# Altium PCB PIC18F.PcbDoc
Units mm, origin at the board's own origin, x right, y up, seen from the top; angles counter-clockwise.
Board outline 68 x 46 mm, 2 copper layers (Top Layer, Bottom Layer); 20 components, 29 nets, 98 pads, 0 vias.
Unrouted connection lines stored in the file: 20.
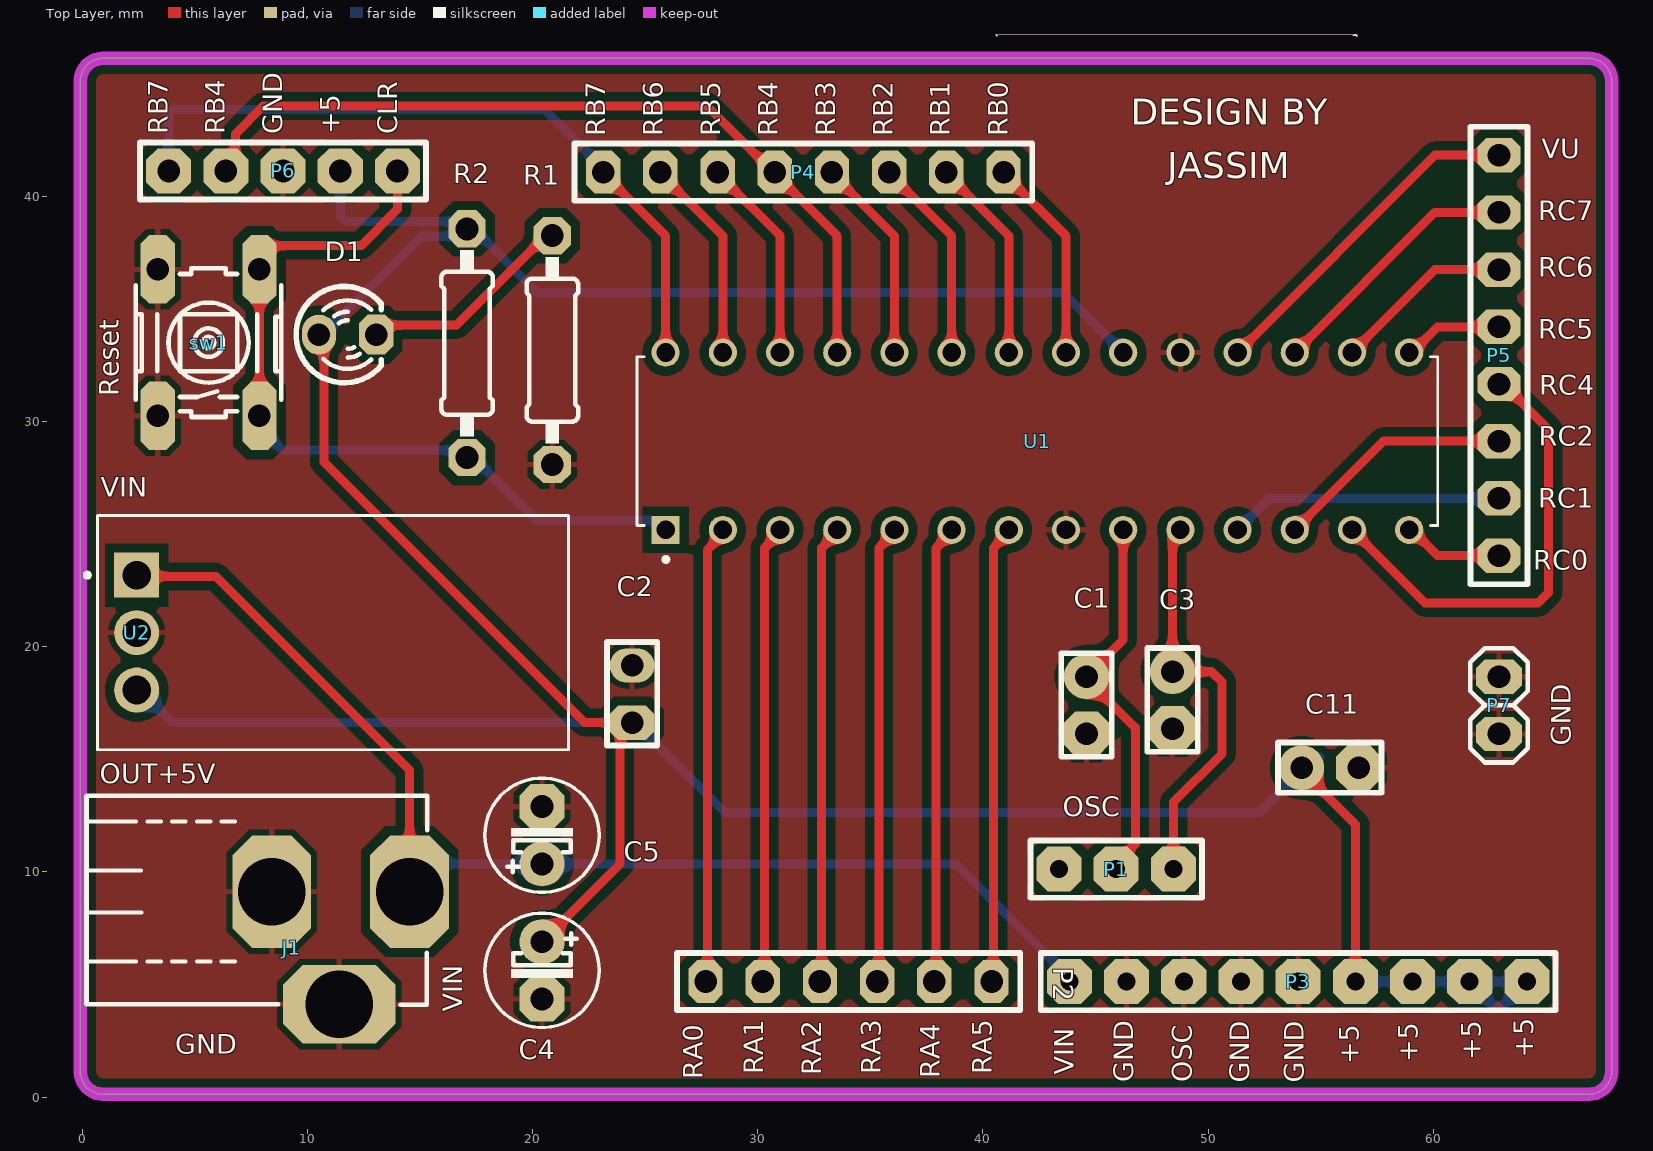
[diagram p0: Top Layer view]
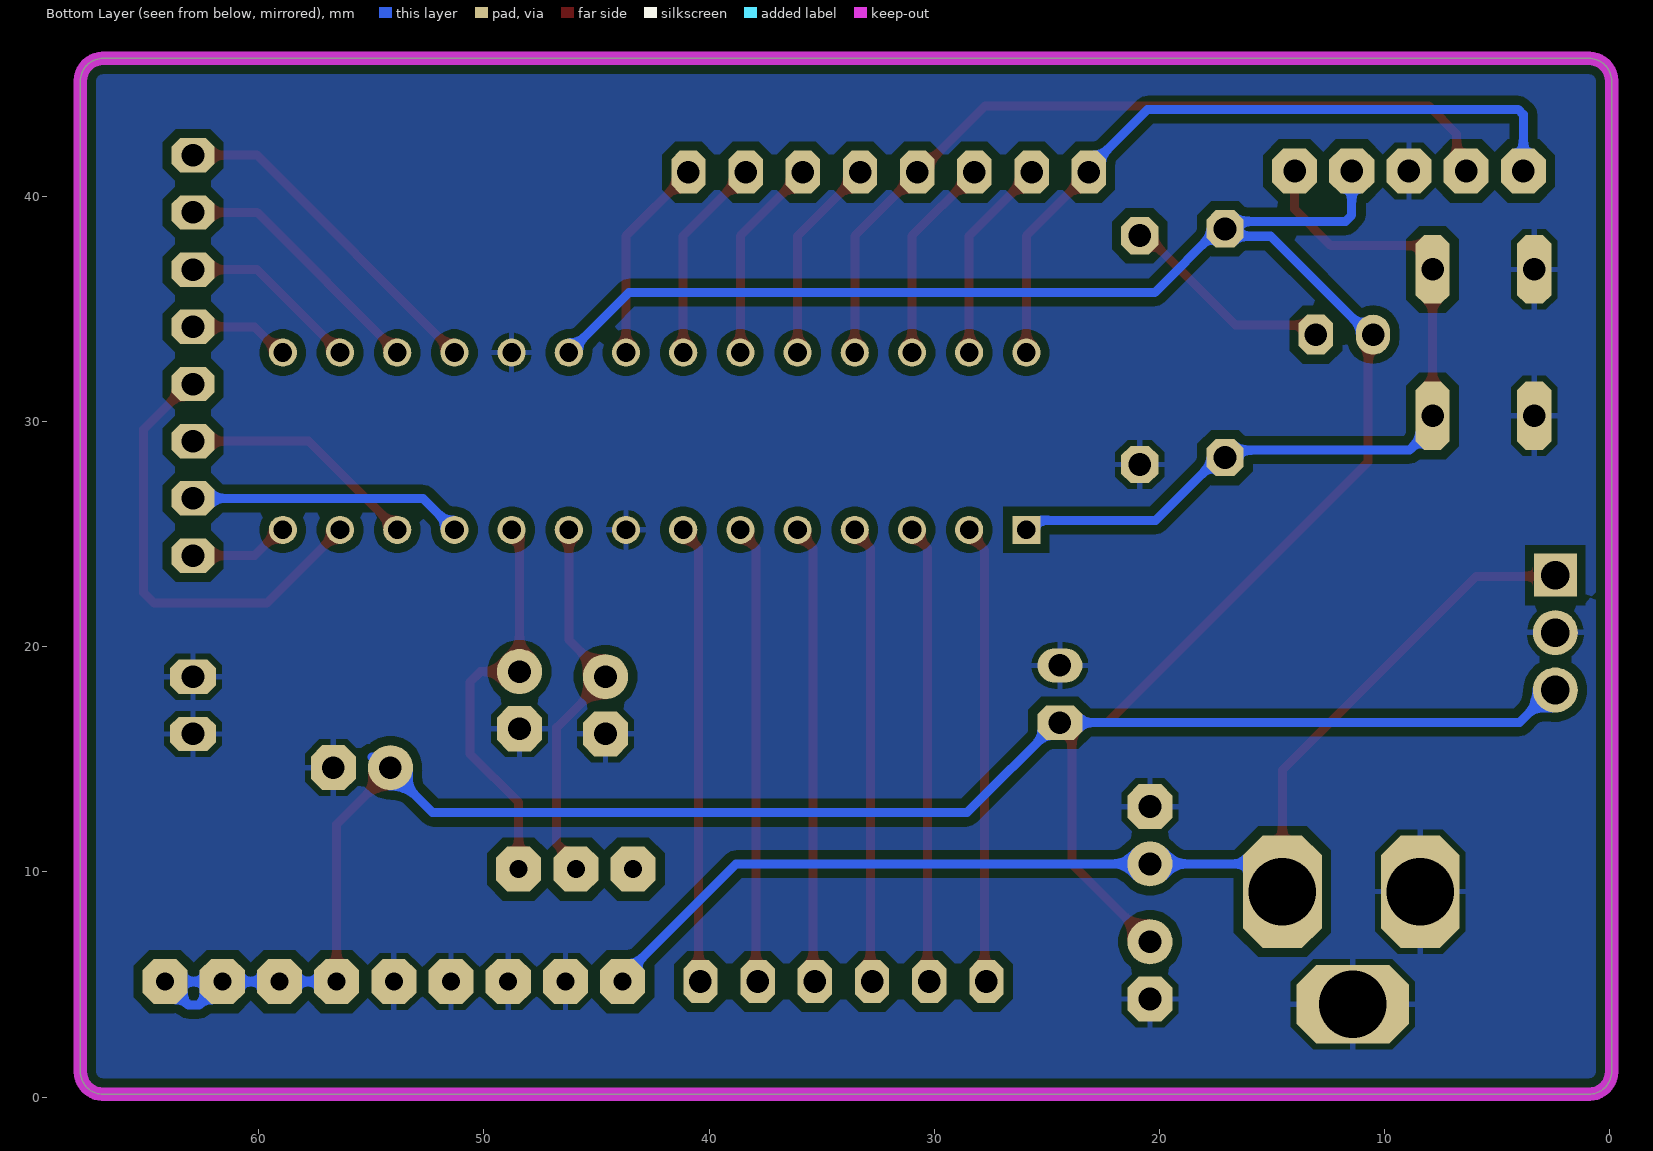
[diagram p1: Bottom Layer view, seen from below]
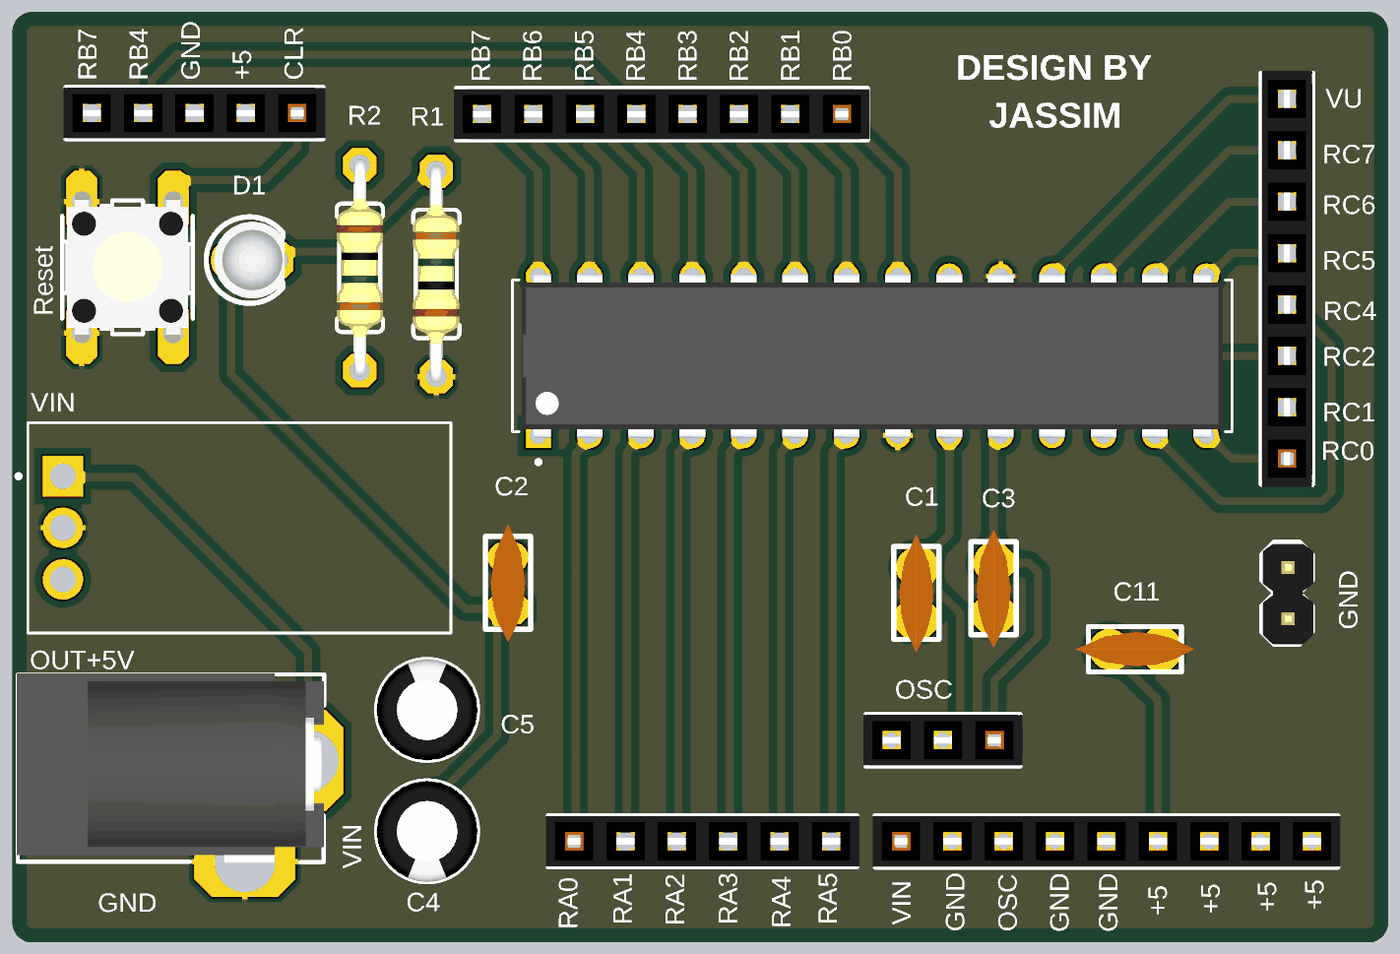
[diagram p2: 3D render of the assembled board from above, using the file's embedded part models]

## Layer stack, top to bottom
Top Solder: solder mask 0.0102, Solder Resist, Dk 3.5
Top Layer: signal copper 0.0356
Dielectric 1: dielectric 0.32, FR-4, Dk 4.8
Bottom Layer: signal copper 0.0356
Bottom Solder: solder mask 0.0102, Solder Resist, Dk 3.5

## Board outline
0.922,0.125 cw(c0.922,1.125) -0.078,1.125 -0.078,45.125 cw(c0.922,45.125) 0.922,46.125 66.922,46.125 cw(c66.922,45.125) 67.922,45.125 67.922,1.125 cw(c66.922,1.125) 66.922,0.125

## Design rules (kind name [scope] priority, off if disabled: settings)
Clearance [All] p1: gap=0.4 ignorepadtopadclearanceinfootprint=FALSE
HoleSize [All] p1: absolutevalues=TRUE maxlimit=10 minlimit=0 maxpercent=80.000 minpercent=20.000
PolygonConnect [All] p1: connectstyle=Relief reliefconductorwidth=0.254 reliefentries=4 polygonreliefangle="90 Angle" airgapwidth=0.254
RoutingVias [All] p1: holewidth=0.711 width=1.27 viastyle="Through Hole" minholewidth=0.711 minwidth=1.27 maxholewidth=0.711 maxwidth=1.27
SilkToSilkClearance [All] p1: silktosilkclearance=0
SilkToSolderMaskClearance [IsPad] p1: minsilkscreentomaskgap=0 clearancetoexposedcopper=TRUE
SolderMaskExpansion [All] p1: expansion=0.102 istentingtop=FALSE
SupplyNets "Schematic Supply Nets_2" [InNet('+5')] p1: voltage=0.000
SupplyNets "Schematic Supply Nets_1" [InNet('VIN')] p2: voltage=0.000
SupplyNets "Schematic Supply Nets" [InNet('GND')] p3: voltage=0.000
Width [All] p1: maxlimit=1 minlimit=0.254 preferedwidth=0.254
27 further rules are at their usual default settings.

## Components (designator, comment, footprint, x,y, rotation, side; value= is the part's Value field where it differs from the comment)
C1 "22pF" My_cap100n#1 44.602,17.399 r90 top
C2 "100nF" My_cap100n#2 24.422,17.895 r90 top
C3 "22pF" My_cap100n#1 48.422,17.625 r90 top
C4 "1uf" MY_E2.5-5mm 20.422,5.625 r270 top
C5 "100uf" MY_E2.5-5mm 20.422,11.625 r90 top
C11 "100nF" My_cap100n#1 55.422,14.625 r180 top
D1 "LED" My_LED3MM 11.786,33.858 r0 top
J1 "DC_Jack" My_DC_Jack 5.171,9.125 r270 top
P1 "Header 3" MY_FE03 45.922,10.125 r180 top
P2 "Header 6" MY_FE06 34.036,5.131 r0 top
P3 "Header 9" MY_FE09 54.002,5.125 r0 top
P4 "Header 8" MY_FE08 32.029,41.072 r180 top
P5 "Header 8" MY_FE08 62.922,32.935 r90 top
P6 "Header 5" MY_FE05 8.922,41.125 r180 top
P7 "Header 2" My_1X02 62.922,18.665 r90 top
R1 "330R" MY_(0.25w)_0207_10 20.879,33.172 r90 top
R2 "10K" MY_(0.25w)_0207_10 17.094,33.477 r270 top
sw1 "Tac switch" MY_TACTILE-PTH 5.613,33.503 r90 top
U1 "PIC18F2550-I/SP" DIP787W45P254L3556H508Q28 42.422,29.125 r90 top
U2 "L7805CV" TO255P1040X460X1968-3 2.422,23.175 r270 top

## Footprints (in the part's own frame and the unit in brackets; to place one, negate y for a bottom-side part, rotate by r counter-clockwise, add the part's x,y. Pads: shape width x height; smd on the part's side, far side on the other; paste and mask are expansions set on the pad)
DIP787W45P254L3556H508Q28 [mm]
  rect 1.25x1.25 / inner round 1.25 / far side rect 1.25x1.25 hole 0.83: 1(-3.937,16.51)
  round 1.25 hole 0.83: 2(-3.937,13.97) 3(-3.937,11.43) 4(-3.937,8.89) 5(-3.937,6.35) 6(-3.937,3.81) 7(-3.937,1.27) 8(-3.937,-1.27) 9(-3.937,-3.81) 10(-3.937,-6.35) 11(-3.937,-8.89) 12(-3.937,-11.43) 13(-3.937,-13.97) 14(-3.937,-16.51) 15(3.937,-16.51) 16(3.937,-13.97) 17(3.937,-11.43) 18(3.937,-8.89) 19(3.937,-6.35) 20(3.937,-3.81) 21(3.937,-1.27) 22(3.937,1.27) 23(3.937,3.81) 24(3.937,6.35) 25(3.937,8.89) 26(3.937,11.43) 27(3.937,13.97) 28(3.937,16.51)
  silkscreen extent -5.35,-17.78 3.75,17.78, body extent -4.06,-17.34 4.06,17.34, height 5.08
My_1X02 [mil]
  oct 60x80 hole 39.37: 1(-100,0) 2(0,0)
  silkscreen extent -150,-50 50,50, body extent -150,-51 46,47, height 323
MY_(0.25w)_0207_10 [mil]
  oct 65x65 hole 40: 1(-200,0) 2(200,0)
  silkscreen extent -163,-45 163,45, body extent -212,-45 212,46, height 96
My_cap100n#1 [mm]
  oct 2x2 hole 1: 1(-1.27,0)
  round 2 hole 1: 2(1.27,0)
  silkscreen extent -2.29,-1.12 2.31,1.12, body extent -2.92,-0.85 2.92,0.85, height 6.22
My_cap100n#2 [mm]
  oct 1.524x2 hole 1: 1(-1.27,0)
  oval 1.524x2 hole 1: 2(1.27,0)
  silkscreen extent -2.29,-1.12 2.31,1.12, body extent -2.92,-0.85 2.92,0.85, height 6.22
My_DC_Jack [mm]
  round 0 on Top Paste: 0(0,-1.118)
  oct 5x3.5 hole 3: 1(0,9.373) 3(0,3.251)
  oct 3.5x5 hole 3: 2(5.004,6.248)
  silkscreen extent -4.25,-4.98 5.03,10.16, body extent -4.32,-5.04 5.08,10.16, height 11.02
MY_E2.5-5mm [mm]
  round 2 hole 1.016: +(-1.27,0)
  oct 2x2 hole 1.016: -(1.27,0)
  silkscreen extent -2.54,-2.54 2.54,2.54, body extent -2.5,-2.5 2.49,2.5, height 10.03
MY_FE03 [mm]
  oct 2x2 hole 0.8: 1(-2.54,0) 2(0,0) 3(2.54,0)
  silkscreen extent -3.81,-1.27 3.81,1.27, body extent -3.93,-1.25 3.94,1.25, height 8.5
MY_FE05 [mm]
  oct 2x2 hole 1: 1(-5.08,0) 2(-2.54,0) 3(0,0) 4(2.54,0) 5(5.08,0)
  silkscreen extent -6.35,-1.27 6.35,1.27, body extent -6.47,-1.25 6.48,1.25, height 8.5
MY_FE06 [mm]
  oct 1.524x1.905 hole 1: 1(-6.35,0) 2(-3.81,0) 3(-1.27,0) 4(1.27,0) 5(3.81,0) 6(6.35,0)
  silkscreen extent -7.62,-1.27 7.62,1.27, body extent -7.74,-1.25 7.75,1.25, height 8.5
MY_FE08 [mm]
  oct 1.524x1.905 hole 1: 1(-8.89,0) 2(-6.35,0) 3(-3.81,0) 4(-1.27,0) 5(1.27,0) 6(3.81,0) 7(6.35,0) 8(8.89,0)
  silkscreen extent -10.16,-1.27 10.16,1.27, body extent -10.28,-1.25 10.29,1.25, height 8.5
MY_FE09 [mm]
  oct 2x2 hole 0.8: 1(-10.16,0) 2(-7.62,0) 3(-5.08,0) 4(-2.54,0) 5(0,0) 6(2.54,0) 7(5.08,0) 8(7.62,0) 9(10.16,0)
  silkscreen extent -11.43,-1.27 11.43,1.27, body extent -11.55,-1.25 11.56,1.25, height 8.5
My_LED3MM [mil]
  oval 60x70 hole 39.37: A(-50,0)
  oct 60x70 hole 39.37: K(50,0)
  silkscreen extent -90,-84 59,84, body extent -75,-75 63,75, height 217
MY_TACTILE-PTH [mil]
  oct 120x60 hole 39.37: 1(-128,89) 1(128,89) 2(-128,-89) 2(128,-89)
  silkscreen extent -130,-127 130,127, body extent -152,-118 152,118, height 197
TO255P1040X460X1968-3 [mm]
  rect 2x2 / inner round 1.91 / far side rect 1.91x1.91 hole 1.27: 1(0,0)
  round 2 hole 1.27: 2(2.55,0) 3(5.1,0)
  silkscreen extent -2.65,-2.29 7.75,19.18, body extent -2.56,-0.2 7.64,19.06, height 4.5

## Part data
C1 C2 C3 C11: library part "Cap ceramic", "None polar capacitor", ASiD Part Number=C-AS, Volte=50v
C4 C5: library part "Cap Pol", "Polar capacitor", ASiD Part Number=C-AS, Volte=25v
D1: "Typical INFRARED GaAs LED", ASiD Part Number=LED-AS
J1: ASiD Part Number=DC_Jack-AS
P1: "Header, 3-Pin", ASiD Part Number="Header 3-AS"
P2: "Header, 6-Pin", ASiD Part Number="Header 6-AS"
P3: "Header, 9-Pin", ASiD Part Number="Header 9-AS"
P4 P5: "Header, 8-Pin, Dual row", ASiD Part Number="Header 8-AS"
P6: "Header, 5-Pin", ASiD Part Number="Header 5-AS"
P7: "Header, 2-Pin", ASiD Part Number="Header 2-AS"
R1 R2: library part Res, "Standard resistor 1K", ASiD Part Number=Res-AS
sw1: "small tac switch", ASiD Part Number="Tac switch-AS"
U1: "PIC PICÂ® 18F Microcontroller IC 8-Bit 48MHz 32KB (16K x 16) FLASH 28-SPDIP", Package="SPDIP-28 Microchip", Check_prices=https://www.snapeda.com/parts/PIC18F2550-I/SP/Microchip/view-part/?ref=eda, Digi-Key_Part_Number=PIC18F2550-I/SP-ND, MF=Microchip, MP=PIC18F2550-I/SP, Purchase-URL=https://pricing.snapeda.com/search/part/PIC18F2550-I/SP/?ref=eda, SnapEDA_Link=https://www.snapeda.com/parts/PIC18F2550-I/SP/Microchip/view-part/?ref=snap
U2: "Linear Voltage Regulator IC Positive Fixed 1 Output 1.5A TO-220", Package="TO-220-3 STMicroelectronics", Check_prices=https://www.snapeda.com/parts/L7805CV/STMicroelectronics/view-part/?ref=eda, MF=STMicroelectronics, MP=L7805CV, SnapEDA_Link=https://www.snapeda.com/parts/L7805CV/STMicroelectronics/view-part/?ref=snap

## Nets (pads, with @x,y where several pads share a name; then routed paths per layer and width w, separated by ;. In a path a pad name is that pad's centre, name@x,y a point inside that pad or via, vN(x,y) a via of type N, cw(c..) or ccw(c..) an arc to the next point about the centre after c; other vN are vias at no path point)
+5: C2.1 C4.+ C11.2 D1.A P3.6 P3.7 P3.8 P3.9 P6.2 R2.1 U1.20 U2.3 | length 158.2
  Top Layer w0.4: D1.A 10.731,33.643 10.731,28.208 22.313,16.625 C2.1 23.886,16.089 23.886,10.359 C4.+ ; C11.2 54.152,14.498 56.542,12.108 P3.6
  Bottom Layer w0.4: U2.3 2.57,18.075 4.02,16.625 C2.1 ; D1.A 10.693,33.858 15.062,38.227 16.764,38.227 R2.1 ; P6.2 11.462,39.16 11.735,38.887 16.764,38.887 R2.1 ; C2.1@24.549,16.625 28.549,12.625 52.279,12.625 54.152,14.498 C11.2 54.221,14.625 54.699,15.103 C11.2@54.975,15.103 ; U1.20 43.568,35.726 20.221,35.726 17.39,38.557 R2.1 ; P3.6 P3.7 P3.8 62.666,4.081 63.118,4.081 P3.9
GND: C1.1 C2.2 C3.1 C4.- C5.- C11.1 J1.2 J1.3 P3.2 P3.3 P3.4 P3.5 P6.3 P7.1 P7.2 R1.1 sw1.1 U1.8 U1.19 U2.2
MCLR: P6.1 R2.2 sw1.2 U1.1 | length 36.2
  Top Layer w0.4: sw1.2@7.874,30.251 7.874,36.754 7.874,37.252 8.436,37.814 12.389,37.814 14.002,39.427 P6.1
  Bottom Layer w0.4: sw1.2@7.874,30.251 7.874,29.753 8.9,28.727 16.764,28.727 R2.2 17.39,28.397 20.174,25.613 25.487,25.613 U1.1
NetD1_K: D1.K R1.2 | length 9.6
  Top Layer w0.4: D1.K 13.481,34.283 16.614,34.283 20.583,38.252 R1.2
OSC1: C1.2 P1.2 U1.9 | length 17.2
  Top Layer w0.4: C1.2 C1.2@44.729,18.669 ; P1.2 45.922,10.391 46.768,11.237 46.768,16.406 44.549,18.625 46.232,20.308 U1.9
OSC2: C3.2 P1.1 U1.10 | length 18
  Top Layer w0.4: P1.1 48.462,13.091 50.622,15.251 50.622,18.427 50.154,18.895 C3.2 48.422,24.716 48.772,25.066 U1.10
RA0: P2.1 U1.2 | length 20.3
  Top Layer w0.4: P2.1@27.762,5.125 27.762,24.295 28.452,24.985 U1.2
RA1: P2.2 U1.3 | length 20.3
  Top Layer w0.4: P2.2@30.302,5.125 30.302,24.376 30.992,25.066 U1.3
RA2: P2.3 U1.4 | length 20.3
  Top Layer w0.4: P2.3@32.842,5.125 32.842,24.376 33.532,25.066 U1.4
RA3: P2.4 U1.5 | length 20.3
  Top Layer w0.4: P2.4@35.382,5.125 35.382,24.376 36.072,25.066 U1.5
RA4: P2.5 U1.6 | length 20.3
  Top Layer w0.4: P2.5@37.922,5.125 37.922,24.376 38.612,25.066 U1.6
RA5: P2.6 U1.7 | length 20.3
  Top Layer w0.4: P2.6@40.462,5.125 40.462,24.376 41.152,25.066 U1.7
RB0: P4.1 U1.21 | length 9.2
  Top Layer w0.4: P4.1@41.002,41.125 41.002,40.935 43.692,38.245 U1.21
RB1: P4.2 U1.22 | length 9.2
  Top Layer w0.4: P4.2@38.462,41.125 38.462,40.935 41.152,38.245 U1.22
RB2: P4.3 U1.23 | length 9.2
  Top Layer w0.4: P4.3@35.922,41.125 35.922,40.935 38.612,38.245 U1.23
RB3: P4.4 U1.24 | length 9.2
  Top Layer w0.4: P4.4@33.382,41.125 33.382,40.935 36.072,38.245 U1.24
RB4: P4.5 P6.4 U1.25 | length 36.5
  Top Layer w0.4: P6.4 6.799,41.542 6.799,42.766 8.052,44.018 27.74,44.018 30.686,41.072 P4.5 ; P4.5@30.842,40.935 33.532,38.245 U1.25
RB5: P4.6 U1.26 | length 9.2
  Top Layer w0.4: P4.6@28.302,41.125 28.302,40.935 30.992,38.245 U1.26
RB6: P4.7 U1.27 | length 9.2
  Top Layer w0.4: P4.7@25.762,41.125 25.762,40.935 28.452,38.245 U1.27
RB7: P4.8 P6.5 U1.28 | length 32.3
  Top Layer w0.4: P4.8@23.222,41.125 23.222,40.935 25.912,38.245 U1.28
  Bottom Layer w0.4: P6.5 3.842,43.631 4.076,43.866 20.525,43.866 P4.8@23.229,41.162
RC0: P5.2 U1.11 | length 12.2
  Bottom Layer w0.4: U1.11 52.709,26.585 P5.2
RC1: P5.3 U1.12 | length 10.7
  Top Layer w0.4: U1.12 57.789,29.125 P5.3
RC2: P5.4 U1.13 | length 20.5
  Top Layer w0.4: U1.13 59.635,21.946 64.657,21.946 65.126,22.414 65.126,29.644 63.104,31.665 P5.4
RC3: P5.5 U1.15 | length 4.5
  Top Layer w0.4: U1.15 59.054,33.062 60.197,34.205 P5.5
RC4: P5.6 U1.16 | length 8.1
  Top Layer w0.4: U1.16 60.075,36.745 P5.6
RC5: P5.7 U1.17 | length 11.6
  Top Layer w0.4: U1.17 60.075,39.285 P5.7
RC6: P5.8 U1.18 | length 15.2
  Top Layer w0.4: U1.18 60.075,41.825 P5.8
VIN: C5.+ J1.1 P3.1 U2.1 | length 53.2
  Top Layer w0.4: U2.1 2.472,23.125 5.922,23.125 14.543,14.504 J1.1
  Bottom Layer w0.4: J1.1 15.771,10.353 20.419,10.353 C5.+ 38.802,10.355 43.842,5.316 P3.1
VU: P5.1 U1.14 | length 4.5
  Top Layer w0.4: U1.14 59.054,25.188 60.197,24.045 P5.1
pads on no net: J1.0 P1.3

## Polygon pours and split planes (outlines as drawn)
GND on Bottom Layer "GND_L02_P000" (solid, remove dead copper, pour order 0): 0.922,22.125 -1.078,24.125 -1.078,50.125 73.922,50.125 75.922,48.125 73.922,46.125 73.922,-5.875 -1.078,-5.875 -1.078,24.125
GND on Top Layer "GND_L01_P001" (solid, remove dead copper, pour order 1): -3.078,50.125 -3.078,-7.875 -6.078,-10.875 73.922,-10.875 73.922,46.125 77.922,50.125

## Keep-outs
Keep-Out Layer:
  the board outline again, w0.6

## Silkscreen, mask and mechanical layers (free items; w line width, h text height)
Top Overlay:
  region: 51.388,47.17 40.635,47.169 40.634,47.153 40.618,47.154 40.617,47.17 40.604,47.171 40.598,47.169 40.599,47.151 40.618,47.152 40.619,47.132 40.635,47.131 40.634,47.106 40.618,47.107 40.617,47.132 40.599,47.134 40.597,47.151 40.578,47.153 40.569,47.158 40.567,47.167 40.572,47.174 40.582,47.178 40.586,47.18 40.592,47.186 40.601,47.188 56.491,47.186 56.497,47.184 56.504,47.186 56.512,47.188 56.529,47.189 56.558,47.187 56.569,47.185 56.57,47.18 56.564,47.17 56.558,47.169 56.605,47.168 56.615,47.172 56.628,47.17 56.631,47.167 56.629,47.158 56.626,47.155 56.611,47.153 56.603,47.151 56.602,47.15 56.604,47.144 56.605,47.114 56.621,47.112 56.622,47.1 56.619,47.097 56.607,47.095 56.604,47.098 56.603,47.114 56.586,47.112 56.584,47.108 56.583,47.148 56.585,47.15 56.57,47.151 56.566,47.147 56.554,47.148 56.556,47.152 56.558,47.158 56.557,47.168 56.508,47.17 56.504,47.174 56.489,47.172 56.48,47.169 56.517,47.167 56.513,47.154 56.509,47.15 56.51,47.147 56.554,47.146 56.553,47.13 56.509,47.131 56.508,47.147 56.478,47.148 56.48,47.156 56.479,47.168 56.424,47.169 56.445,47.167 56.446,47.147 56.478,47.146 56.477,47.13 56.445,47.131 56.444,47.147 56.424,47.148 56.423,47.168 56.378,47.17 51.39,47.17
  text "DESIGN BY" at 46.558,42.772 h2
  text "RB7" at 4.089,42.748 h1.5 r90
  text "RB4" at 6.62,42.748 h1.5 r90
  text "GND" at 9.184,42.748 h1.5 r90
  text "+5" at 11.719,42.748 h1.5 r90
  text "CLR" at 14.284,42.748 h1.5 r90
  text "RB7" at 23.52,42.67 h1.5 r90
  text "RB6" at 26.081,42.67 h1.5 r90
  text "RB5" at 28.637,42.67 h1.5 r90
  text "RB4" at 31.177,42.67 h1.5 r90
  text "RB3" at 33.737,42.67 h1.5 r90
  text "RB2" at 36.281,42.67 h1.5 r90
  text "RB1" at 38.825,42.67 h1.5 r90
  text "RB0" at 41.385,42.67 h1.5 r90
  text "VU" at 64.827,41.392 h1.5
  text "JASSIM" at 48.184,40.41 h2
  text "RC7" at 64.672,38.642 h1.5
  text "RC6" at 64.672,36.142 h1.5
  text "RC5" at 64.668,33.392 h1.5
  text "Reset" at 1.907,31.116 h1.5 r90
  text "RC4" at 64.712,30.892 h1.5
  text "RC2" at 64.677,28.642 h1.5
  text "VIN" at 0.828,26.375 h1.5
  text "RC1" at 64.669,25.892 h1.5
  text "RC0" at 64.435,23.125 h1.5
  text "GND" at 66.405,15.59 h1.5 r90
  text "OUT+5V" at 0.781,13.642 h1.5
  text "OSC" at 43.539,12.183 h1.5
  text "VIN" at 17.172,3.781 h1.5 r90
  text "+5" at 64.728,1.737 h1.5 r90
  text "GND" at 4.137,1.642 h1.5
  text "+5" at 62.391,1.636 h1.5 r90
  text "+5" at 59.597,1.534 h1.5 r90
  text "+5" at 56.981,1.458 h1.5 r90
  text "RA1" at 30.531,1.005 h1.5 r90
  text "RA3" at 35.747,1.014 h1.5 r90
  text "RA5" at 40.674,1.011 h1.5 r90
  text "VIN" at 44.323,0.998 h1.5 r90
  text "RA2" at 33.122,0.968 h1.5 r90
  text "RA4" at 38.379,0.838 h1.5 r90
  text "RA0" at 27.847,0.787 h1.5 r90
  text "GND" at 46.973,0.664 h1.5 r90
  text "OSC" at 49.564,0.664 h1.5 r90
  text "GND" at 52.13,0.639 h1.5 r90
  text "GND" at 54.543,0.639 h1.5 r90

## Dimensions
66.922,46.125 to -0.078,45.125 on Mechanical 13
67.922,45.125 to 66.922,0.125 on Mechanical 13